# Altium PCB mla_opamp.PcbDoc (part 2 of 3)
Units mil, origin at the board's own origin, x right, y up, seen from the top; angles counter-clockwise.
Board outline 7165.35 x 3582.68 mil, 4 copper layers (Top Layer, PWD, GND, Bottom Layer), stack 23.756 mil thick; 177 components, 237 nets, 809 pads, 473 vias.
Unrouted connection lines stored in the file: 312.
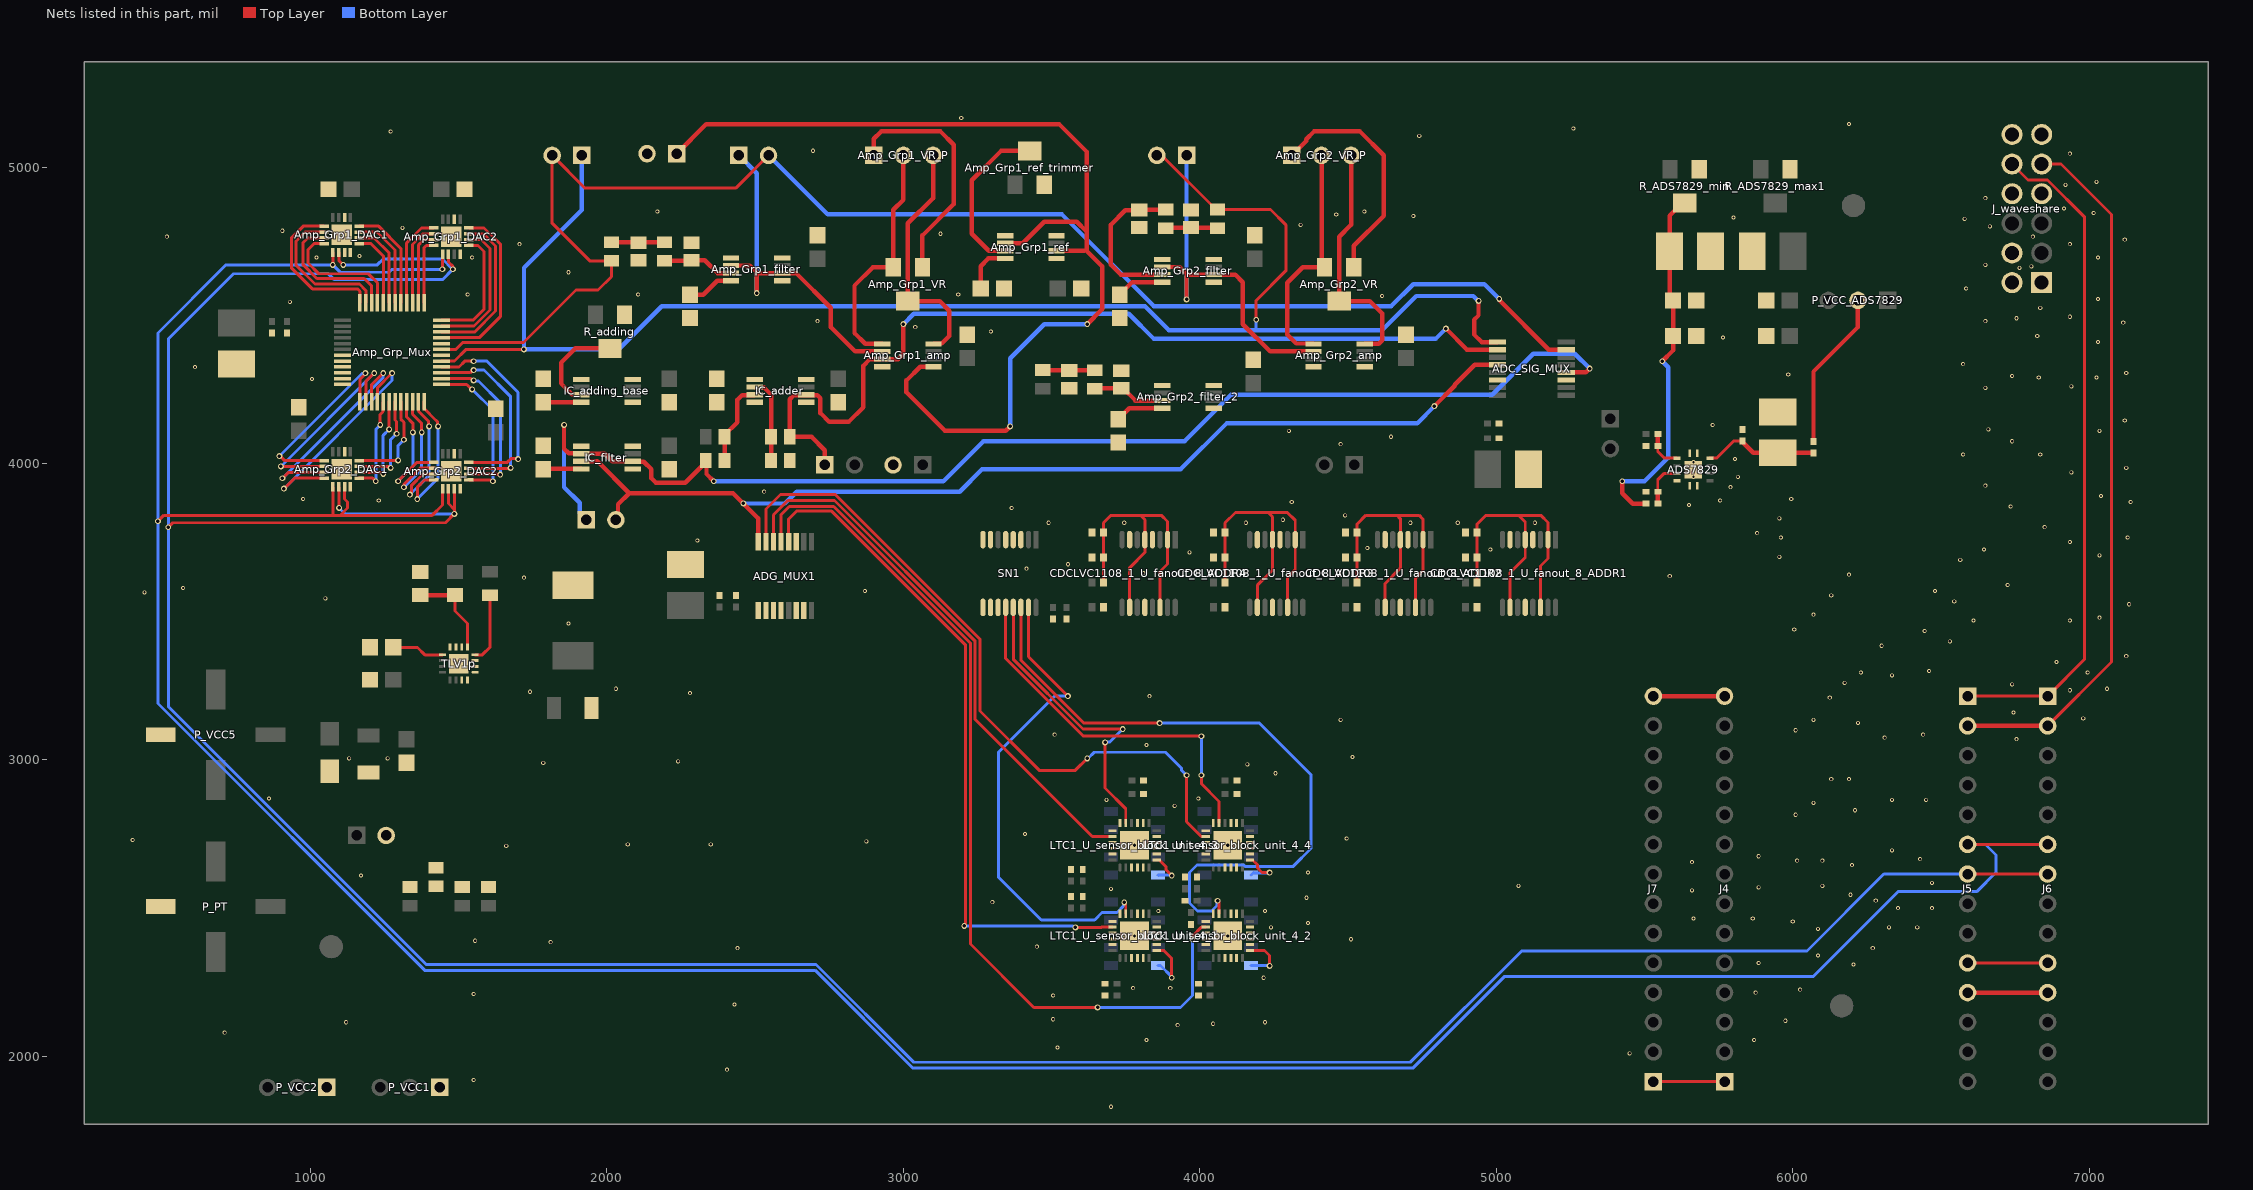
[diagram p4: the nets of this part, all layers, seen from the top]

## Via types
v1: diameter 13.78, hole 7.87, Top Layer to Bottom Layer, 282 vias
v2: diameter 19.68, hole 11.81, Top Layer to Bottom Layer, 187 vias
v3: diameter 20, hole 11, Top Layer to Bottom Layer, 4 vias

## Nets (pads, with @x,y where several pads share a name; then routed paths per layer and width w, separated by ;. In a path a pad name is that pad's centre, name@x,y a point inside that pad or via, vN(x,y) a via of type N, cw(c..) or ccw(c..) an arc to the next point about the centre after c; other vN are vias at no path point) (continued)
ADS7829_MIN: C_ADS7827_1.1 C_ADS7827_2.2 C_ADS7827_3.2 R3.1 R_ADS7829_min.W | length 1236
  Top Layer w15: v2(5425,3940) 5425,3900 5460.53,3864.47 R3.1@5505.31,3864.47 ; v2(5560,4345) 5596.31,4381.31 C_ADS7827_2.2@5596.31,4430 C_ADS7827_3.2@5596.31,4550 5584.47,4561.84 C_ADS7827_1.1@5584.47,4715.83 5584.47,4835.4 5627.8,4878.74 R_ADS7829_min.W@5635.68,4878.74
  Bottom Layer w15: v2(5425,3940) 5500,3940 5580,4020 5580,4325 v2(5560,4345)
amp_base_mux_grp1: ADC_SIG_MUX.7 Amp_Grp1_filter_R1.1 Amp_Grp1_P_base_o_of.2 Amp_Grp_Mux.43 Amp_Grp_Mux_P_base.2 | length 5057
  Top Layer w10: Amp_Grp_Mux.43@1441.85,4384.84 1489.84,4384.84 1513.21,4408.21 1718.21,4408.21 1895,4585 1970,4585 2015,4630 Amp_Grp1_filter_R1.1@2015,4683.5 1941.5,4683.5 1815,4810 Amp_Grp_Mux_P_base.2@1815,5039.37 1924.37,4930 2435.63,4930 Amp_Grp1_P_base_o_of.2@2545,5039.37
  Top Layer w15: v2(5010,4555) 5010,4551.39 5177.42,4383.98 ADC_SIG_MUX.7@5235.67,4383.98
  Bottom Layer w15: Amp_Grp1_P_base_o_of.2@2545,5039.37 2744.37,4840 3535,4840 3845,4530 4645,4530 4720,4605 4960,4605 v2(5010,4555)
amp_base_mux_grp2: ADC_SIG_MUX.9 Amp_Grp2_filter_R1.1 Amp_Grp2_P_base_o_of.2 Amp_Grp_Mux.41 Amp_Grp_Mux_P_base.1 | length 5537.4
  Top Layer w10: Amp_Grp_Mux.41@1441.85,4345.47 1485.47,4345.47 1525,4385 v2(1720,4385) ; Amp_Grp2_P_base_o_of.2@3855,5039.37 3864.39,5029.98 3880.61,5029.98 4054.09,4856.5 Amp_Grp2_filter_R1.1@4060,4856.5 4238.5,4856.5 4290,4805 4290,4650 4190,4550 v2(4190,4485)
  Top Layer w15: v2(4940,4548.34) 4940,4499.37 4925,4484.37 4925,4435 4950.43,4409.57 ADC_SIG_MUX.9@5004.33,4409.57
  Bottom Layer w10: 4185,4450 4190,4455 v2(4190,4485)
  Bottom Layer w15: Amp_Grp_Mux_P_base.1@1915,5039.37 1915,4855 1720,4660 v2(1720,4385) 2040,4385 2185,4530 3815,4530 3895,4450 4185,4450 4615,4450 4730,4565 4922.07,4565 4938.73,4548.34 v2(4940,4548.34)
amp_grp1_base1: Amp_Grp1_DAC1.1 Amp_Grp_Mux.12 | length 531.1
  Top Layer w10: Amp_Grp1_DAC1.1@1045.94,4800.37 975.37,4800.37 935,4760 935,4660 1006,4589 1158.37,4589 1166.73,4580.64 Amp_Grp_Mux.12@1166.73,4541.85
amp_grp1_base2: Amp_Grp1_DAC1.2 Amp_Grp_Mux.11 | length 501.2
  Top Layer w10: Amp_Grp1_DAC1.2@1045.94,4780.69 981.68,4780.69 951,4750 951,4669 1015,4605 1165,4605 1186.42,4583.58 Amp_Grp_Mux.11@1186.42,4541.85
amp_grp1_base3: Amp_Grp1_DAC1.3 Amp_Grp_Mux.10 | length 470.2
  Top Layer w10: Amp_Grp1_DAC1.3@1045.94,4761 991,4761 975,4745 975,4670 1021,4624 1181,4624 1206.1,4598.9 Amp_Grp_Mux.10@1206.1,4541.85
amp_grp1_base4: Amp_Grp1_DAC1.4 Amp_Grp_Mux.9 | length 437.8
  Top Layer w10: Amp_Grp1_DAC1.4@1045.94,4741.31 1011.31,4741.31 991,4721 991,4676.63 1027.63,4640 1195,4640 1225.79,4609.21 Amp_Grp_Mux.9@1225.79,4541.85
amp_grp1_base5: Amp_Grp1_DAC1.9 Amp_Grp_Mux.8 | length 256.4
  Top Layer w10: Amp_Grp1_DAC1.9@1164.06,4741.31 1203.69,4741.31 1245.47,4699.53 Amp_Grp_Mux.8@1245.47,4541.85
amp_grp1_base6: Amp_Grp1_DAC1.10 Amp_Grp_Mux.7 | length 290.3
  Top Layer w10: Amp_Grp1_DAC1.10@1164.06,4761 1214,4761 1265.16,4709.84 Amp_Grp_Mux.7@1265.16,4541.85
amp_grp1_base7: Amp_Grp1_DAC1.11 Amp_Grp_Mux.6 | length 324.2
  Top Layer w10: Amp_Grp1_DAC1.11@1164.06,4780.69 1224.32,4780.69 1284.84,4720.16 Amp_Grp_Mux.6@1284.84,4541.85
amp_grp1_base8: Amp_Grp1_DAC1.12 Amp_Grp_Mux.5 | length 355.1
  Top Layer w10: Amp_Grp1_DAC1.12@1164.06,4800.37 1229.63,4800.37 1304.53,4725.47 Amp_Grp_Mux.5@1304.53,4541.85
amp_grp1_base9: Amp_Grp1_DAC2.1 Amp_Grp_Mux.4 | length 314.9
  Top Layer w10: Amp_Grp_Mux.4@1324.21,4541.85 1324.21,4744.21 1374.53,4794.53 Amp_Grp1_DAC2.1@1415.94,4794.53
amp_grp1_base10: Amp_Grp1_DAC2.2 Amp_Grp_Mux.3 | length 284
  Top Layer w10: Amp_Grp_Mux.3@1343.9,4541.85 1343.9,4738.9 1379.84,4774.84 Amp_Grp1_DAC2.2@1415.94,4774.84
amp_grp1_base11: Amp_Grp1_DAC2.3 Amp_Grp_Mux.2 | length 254.4
  Top Layer w10: Amp_Grp_Mux.2@1363.58,4541.85 1363.58,4735.96 1382.78,4755.16 Amp_Grp1_DAC2.3@1415.94,4755.16
amp_grp1_base12: Amp_Grp1_DAC2.4 Amp_Grp_Mux.1 | length 222.1
  Top Layer w10: Amp_Grp_Mux.1@1383.27,4541.85 1383.27,4728.27 1390.47,4735.47 Amp_Grp1_DAC2.4@1415.94,4735.47
amp_grp1_base13: Amp_Grp1_DAC2.9 Amp_Grp_Mux.48 | length 412.5
  Top Layer w10: Amp_Grp_Mux.48@1441.85,4483.27 1548.01,4483.27 1584.87,4520.13 1584.87,4715.13 1565,4735 1534.53,4735 Amp_Grp1_DAC2.9@1534.06,4735.47
amp_grp1_base14: Amp_Grp1_DAC2.10 Amp_Grp_Mux.47 | length 476.3
  Top Layer w10: Amp_Grp_Mux.47@1441.85,4463.58 1550.96,4463.58 1605,4517.63 1605,4725 1574.84,4755.16 Amp_Grp1_DAC2.10@1534.06,4755.16
amp_grp1_base15: Amp_Grp1_DAC2.11 Amp_Grp_Mux.46 | length 537.7
  Top Layer w10: Amp_Grp_Mux.46@1441.85,4443.9 1553.9,4443.9 1624,4514 1624,4733.37 1582.53,4774.84 Amp_Grp1_DAC2.11@1534.06,4774.84
amp_grp1_base16: Amp_Grp1_DAC2.12 Amp_Grp_Mux.45 | length 601
  Top Layer w10: Amp_Grp_Mux.45@1441.85,4424.21 1569.21,4424.21 1640,4495 1640,4740 1585.47,4794.53 Amp_Grp1_DAC2.12@1534.06,4794.53
amp_grp1_ref: Amp_Grp1_amp.5 Amp_Grp1_ref.2 Amp_Grp1_ref.6 Amp_Grp1_ref_debug.1 | length 3597.7
  Top Layer w15: Amp_Grp1_ref_debug.1@2235,5045 2335,5145 3525,5145 3617.8,5052.2 3617.8,4782.2 ; Amp_Grp1_amp.5@3101.61,4326.61 3056.61,4326.61 3010,4280 3010,4240 3140,4110 3345,4110 v2(3360,4125) ; Amp_Grp1_ref.2@3343.39,4742.8 3402.8,4742.8 3475,4815 3585,4815 3617.8,4782.2 ; Amp_Grp1_ref.6@3516.61,4717.2 3610.59,4717.2 ; v2(3620,4470) 3670,4520 3670,4665 3617.8,4717.2 3617.8,4782.2
  Bottom Layer w15: v2(3360,4125) 3360,4355 3475,4470 v2(3620,4470)
Amp_Grp1_VR_CCW: Amp_Grp1_VR.1 Amp_Grp1_VR_P.1 | length 811.4
  Top Layer w15: Amp_Grp1_VR_P.1@2900,5039.37 2900,5095 2925,5120 3125,5120 3170,5075 3170,4875 3064.21,4769.21 Amp_Grp1_VR.1@3064.21,4662.09
Amp_Grp1_VR_CW: Amp_Grp1_amp.1 Amp_Grp1_VR.3 Amp_Grp1_VR_P.2 | length 816.5
  Top Layer w15: Amp_Grp1_amp.1@2928.39,4403.39 2871.61,4403.39 2835,4440 2835,4600 2897.09,4662.09 Amp_Grp1_VR.3@2965.79,4662.09 2965.79,4855.79 3000,4890 Amp_Grp1_VR_P.2@3000,5039.37
Amp_Grp1_VR_W: Amp_Grp1_amp.8 Amp_Grp1_VR.2 Amp_Grp1_VR_P.3 | length 829.7
  Top Layer w15: Amp_Grp1_VR_P.3@3100,5039.37 3100,4895 3015,4810 Amp_Grp1_VR.2@3015,4547.91 3122.09,4547.91 3155,4515 3155,4430 3129.74,4404.74 3102.97,4404.74 Amp_Grp1_amp.8@3101.61,4403.39
amp_grp2_base1: Amp_Grp2_DAC1.1 Amp_Grp_Mux.25 | length 667.8
  Top Layer w10: v2(895,4025) 897.62,4025 913.09,4009.53 Amp_Grp2_DAC1.1@1045.94,4009.53 ; Amp_Grp_Mux.25@1166.73,4208.15 1166.73,4284.11 1185,4302.38 v2(1185,4305)
  Bottom Layer w10: v2(895,4025) 1173.15,4303.15 1183.15,4303.15 v2(1185,4305)
amp_grp2_base2: Amp_Grp2_DAC1.2 Amp_Grp_Mux.26 | length 700.2
  Top Layer w10: v2(900,3990) 900.08,3989.92 1045.87,3989.92 Amp_Grp2_DAC1.2@1045.94,3989.84 ; Amp_Grp_Mux.26@1186.42,4208.15 1186.42,4276.42 v2(1215,4305)
  Bottom Layer w10: v2(900,3990) v2(1215,4305)
amp_grp2_base3: Amp_Grp2_DAC1.3 Amp_Grp_Mux.27 | length 758.1
  Top Layer w10: v2(905,3950) 925.16,3970.16 Amp_Grp2_DAC1.3@1045.94,3970.16 ; Amp_Grp_Mux.27@1206.1,4208.15 1206.1,4266.1 v2(1245,4305)
  Bottom Layer w10: v2(905,3950) 1244.93,4289.93 1244.93,4304.93 v2(1245,4305)
amp_grp2_base4: Amp_Grp2_DAC1.4 Amp_Grp_Mux.28 | length 809.1
  Top Layer w10: v2(910,3915) 945.47,3950.47 Amp_Grp2_DAC1.4@1045.94,3950.47 ; Amp_Grp_Mux.28@1225.79,4208.15 1225.79,4255.79 v2(1275,4305)
  Bottom Layer w10: v2(910,3915) 1275,4280 v2(1275,4305)
amp_grp2_base5: Amp_Grp2_DAC1.9 Amp_Grp_Mux.29 | length 339
  Top Layer w10: Amp_Grp2_DAC1.9@1164.06,3950.47 1209.53,3950.47 v2(1220,3940) ; v2(1235,4130) 1235,4165 1244.57,4174.57 1244.57,4207.24 Amp_Grp_Mux.29@1245.47,4208.15
  Bottom Layer w10: v2(1220,3940) 1220,4115 v2(1235,4130)
amp_grp2_base6: Amp_Grp2_DAC1.10 Amp_Grp_Mux.30 | length 334.6
  Top Layer w10: Amp_Grp2_DAC1.10@1164.06,3970.16 1239.84,3970.16 v2(1245,3965) ; v2(1265,4115) 1265.08,4115.08 1265.08,4208.07 Amp_Grp_Mux.30@1265.16,4208.15
  Bottom Layer w10: v2(1245,3965) 1245,4095 v2(1265,4115)
amp_grp2_base7: Amp_Grp2_DAC1.11 Amp_Grp_Mux.31 | length 341.5
  Top Layer w10: Amp_Grp2_DAC1.11@1164.06,3989.84 1265.16,3989.84 v2(1270,3985) ; Amp_Grp_Mux.31@1284.84,4208.15 1284.84,4146.4 1290,4141.24 v2(1290,4100)
  Bottom Layer w10: v2(1270,3985) 1270,4080 v2(1290,4100)
amp_grp2_base8: Amp_Grp2_DAC1.12 Amp_Grp_Mux.32 | length 341.9
  Top Layer w10: Amp_Grp2_DAC1.12@1164.06,4009.53 1294.53,4009.53 v2(1295,4010) ; Amp_Grp_Mux.32@1304.53,4208.15 1304.53,4149.34 1315,4138.87 v2(1315,4080)
  Bottom Layer w10: v2(1295,4010) 1295,4060 v2(1315,4080)
amp_grp2_base9: Amp_Grp2_DAC2.1 Amp_Grp_Mux.33 | length 444.8
  Top Layer w10: v2(1295,3940) 1358.69,4003.69 Amp_Grp2_DAC2.1@1415.94,4003.69 ; Amp_Grp_Mux.33@1324.21,4208.15 1324.21,4156.71 1345,4135.93 v2(1345,4105)
  Bottom Layer w10: v2(1295,3940) 1345,3990 v2(1345,4105)
amp_grp2_base10: Amp_Grp2_DAC2.2 Amp_Grp_Mux.34 | length 459.2
  Top Layer w10: v2(1315,3920) 1315,3930 1369,3984 Amp_Grp2_DAC2.2@1415.94,3984 ; Amp_Grp_Mux.34@1343.9,4208.15 1343.9,4166.1 1375,4135 v2(1375,4105)
  Bottom Layer w10: v2(1315,3920) 1375,3980 v2(1375,4105)
amp_grp2_base11: Amp_Grp2_DAC2.3 Amp_Grp_Mux.35 | length 479.5
  Top Layer w10: v2(1335,3895) 1340,3900 1340,3925 1379.32,3964.32 Amp_Grp2_DAC2.3@1415.94,3964.32 ; Amp_Grp_Mux.35@1363.58,4208.15 1364.49,4207.24 1364.49,4176.43 1398.15,4142.77 1398.15,4126.85 v2(1400,4125)
  Bottom Layer w10: v2(1335,3895) 1400,3960 v2(1400,4125)
amp_grp2_base12: Amp_Grp2_DAC2.4 Amp_Grp_Mux.36 | length 483.1
  Top Layer w10: v2(1360,3880) 1360,3920 1384.63,3944.63 Amp_Grp2_DAC2.4@1415.94,3944.63 ; Amp_Grp_Mux.36@1383.27,4208.15 1383.27,4185.02 1423.29,4145 1424.14,4145 1428.15,4141 1428.15,4126.85 v2(1430,4125)
  Bottom Layer w10: v2(1360,3880) 1430,3950 v2(1430,4125)
amp_grp2_base13: Amp_Grp2_DAC2.9 Amp_Grp_Mux.37 | length 531.9
  Top Layer w10: Amp_Grp_Mux.37@1441.85,4266.73 1526.6,4266.73 1543.33,4250 v2(1545,4250) ; Amp_Grp2_DAC2.9@1534.06,3944.63 1607.75,3944.63 1612.38,3940 v2(1615,3940)
  Bottom Layer w10: v2(1545,4250) 1615,4180 v2(1615,3940)
amp_grp2_base14: Amp_Grp2_DAC2.10 Amp_Grp_Mux.38 | length 581.3
  Top Layer w10: Amp_Grp_Mux.38@1441.85,4286.42 1540.96,4286.42 1547.38,4280 v2(1550,4280) ; Amp_Grp2_DAC2.10@1534.06,3964.32 1624.84,3964.32 1625.86,3963.3 1639.01,3963.3 v2(1640,3962.32)
  Bottom Layer w10: v2(1550,4280) 1551.85,4278.15 1566.85,4278.15 1640,4205 v2(1640,3962.32)
amp_grp2_base15: Amp_Grp2_DAC2.11 Amp_Grp_Mux.39 | length 656.2
  Top Layer w10: Amp_Grp_Mux.39@1441.85,4306.1 1538.48,4306.1 1547.38,4315 v2(1550,4315) ; Amp_Grp2_DAC2.11@1534.06,3984 1534.9,3983.16 1673.16,3983.16 v2(1675,3985)
  Bottom Layer w10: v2(1550,4315) 1585,4315 1675,4225 v2(1675,3985)
amp_grp2_base16: Amp_Grp2_DAC2.12 Amp_Grp_Mux.40 | length 706.8
  Top Layer w10: Amp_Grp_Mux.40@1441.85,4325.79 1500.79,4325.79 1520,4345 v2(1550,4345) ; Amp_Grp2_DAC2.12@1534.06,4003.69 1663.69,4003.69 1676.85,4016.85 1698.15,4016.85 v2(1700,4015)
  Bottom Layer w10: v2(1550,4345) 1595,4345 1700,4240 v2(1700,4015)
Amp_Grp2_VR_CCW: Amp_Grp2_VR.1 Amp_Grp2_VR_P.1 | length 799.5
  Top Layer w15: Amp_Grp2_VR_P.1@4310,5039.37 4358.51,5087.88 4358.51,5093.51 4385,5120 4540,5120 4620,5040 4620,4835 4519.21,4734.21 Amp_Grp2_VR.1@4519.21,4662.09
Amp_Grp2_VR_CW: Amp_Grp2_amp.1 Amp_Grp2_VR.3 Amp_Grp2_VR_P.2 | length 805.6
  Top Layer w15: Amp_Grp2_amp.1@4383.39,4403.39 4382.03,4404.74 4325.26,4404.74 4295,4435 4295,4610 4347.09,4662.09 Amp_Grp2_VR.3@4420.79,4662.09 4411,4671.87 4411,5038.37 Amp_Grp2_VR_P.2@4410,5039.37
Amp_Grp2_VR_W: Amp_Grp2_amp.8 Amp_Grp2_VR.2 Amp_Grp2_VR_P.3 | length 824.5
  Top Layer w15: Amp_Grp2_VR_P.3@4510,5039.37 4510,4805 4470,4765 Amp_Grp2_VR.2@4470,4547.91 4572.91,4547.91 4615,4505.83 4615,4415 4603.39,4403.39 Amp_Grp2_amp.8@4556.61,4403.39
ARDUINO_AREF: J4.1 J7.1 | length 240
  Top Layer w10: J7.1@5530,1915 J4.1@5770,1915
ARDUINO_RESET: J5.10 J6.10 | length 270
  Top Layer w10: J5.10@6590,2315 J6.10@6860,2315
arduino_reset_FPGA: J4.14 J7.14 | length 240
  Top Layer w15: J7.14@5530,3215 J4.14@5770,3215
C_VCC3.3_U_fanout_8_ADDR1: C5_U_fanout_8_ADDR1.2 C10_U_fanout_8_ADDR1.2 CDCLVC1108_1_U_fanout_8_ADDR1.2 CDCLVC1108_1_U_fanout_8_ADDR1.5 CDCLVC1108_1_U_fanout_8_ADDR1.10 CDCLVC1108_1_U_fanout_8_ADDR1.14 FB1_U_fanout_8_ADDR1.2 | length 1095.5
  Top Layer w10: FB1_U_fanout_8_ADDR1.2@4935,3598.89 C5_U_fanout_8_ADDR1.2@4935,3682.78 C10_U_fanout_8_ADDR1.2@4935,3766.67 4935,3795 4965,3825 5075,3825 ; CDCLVC1108_1_U_fanout_8_ADDR1.10@5046.46,3514.68 5046.46,3631.46 5097.64,3682.64 CDCLVC1108_1_U_fanout_8_ADDR1.5@5097.64,3743.03 5097.64,3802.36 5075,3825 ; CDCLVC1108_1_U_fanout_8_ADDR1.14@5148.82,3514.68 5148.82,3653.82 5174.41,3679.41 CDCLVC1108_1_U_fanout_8_ADDR1.2@5174.41,3743.03 5174.41,3800.59 5150,3825 5075,3825
C_VCC3.3_U_fanout_8_ADDR2: C5_U_fanout_8_ADDR2.2 C10_U_fanout_8_ADDR2.2 CDCLVC1108_1_U_fanout_8_ADDR2.2 CDCLVC1108_1_U_fanout_8_ADDR2.5 CDCLVC1108_1_U_fanout_8_ADDR2.10 CDCLVC1108_1_U_fanout_8_ADDR2.14 FB1_U_fanout_8_ADDR2.2 | length 1081.1
  Top Layer w10: FB1_U_fanout_8_ADDR2.2@4530,3598.89 C5_U_fanout_8_ADDR2.2@4530,3682.78 C10_U_fanout_8_ADDR2.2@4530,3766.67 4530,3795 4560,3825 4665,3825 ; CDCLVC1108_1_U_fanout_8_ADDR2.10@4625.14,3514.68 4625.14,3595.14 4676.32,3646.32 CDCLVC1108_1_U_fanout_8_ADDR2.5@4676.32,3743.03 4676.32,3813.68 4665,3825 ; CDCLVC1108_1_U_fanout_8_ADDR2.14@4727.5,3514.68 4727.5,3612.5 4753.09,3638.09 CDCLVC1108_1_U_fanout_8_ADDR2.2@4753.09,3743.03 4753.09,3811.91 4740,3825 4665,3825
C_VCC3.3_U_fanout_8_ADDR3: C5_U_fanout_8_ADDR3.2 C10_U_fanout_8_ADDR3.2 CDCLVC1108_1_U_fanout_8_ADDR3.2 CDCLVC1108_1_U_fanout_8_ADDR3.5 CDCLVC1108_1_U_fanout_8_ADDR3.10 CDCLVC1108_1_U_fanout_8_ADDR3.14 FB1_U_fanout_8_ADDR3.2 | length 1115.5
  Top Layer w10: FB1_U_fanout_8_ADDR3.2@4084.69,3598.89 C5_U_fanout_8_ADDR3.2@4084.69,3682.78 C10_U_fanout_8_ADDR3.2@4084.69,3766.67 4084.69,3799.69 4120,3835 4230,3835 ; CDCLVC1108_1_U_fanout_8_ADDR3.10@4193.82,3514.68 4193.82,3588.82 4245,3640 CDCLVC1108_1_U_fanout_8_ADDR3.5@4245,3743.03 4245,3820 4230,3835 ; CDCLVC1108_1_U_fanout_8_ADDR3.14@4296.18,3514.68 4296.18,3616.18 4321.77,3641.77 CDCLVC1108_1_U_fanout_8_ADDR3.2@4321.77,3743.03 4321.77,3808.23 4295,3835 4230,3835
C_VCC3.3_U_fanout_8_ADDR4: C5_U_fanout_8_ADDR4.2 C10_U_fanout_8_ADDR4.2 CDCLVC1108_1_U_fanout_8_ADDR4.2 CDCLVC1108_1_U_fanout_8_ADDR4.5 CDCLVC1108_1_U_fanout_8_ADDR4.10 CDCLVC1108_1_U_fanout_8_ADDR4.14 FB1_U_fanout_8_ADDR4.2 | length 1074.3
  Top Layer w10: FB1_U_fanout_8_ADDR4.2@3674.69,3598.89 C5_U_fanout_8_ADDR4.2@3674.69,3682.78 C10_U_fanout_8_ADDR4.2@3674.69,3766.67 3674.69,3799.69 3700,3825 3800,3825 ; CDCLVC1108_1_U_fanout_8_ADDR4.10@3763.23,3514.68 3763.23,3648.23 3814.41,3699.41 CDCLVC1108_1_U_fanout_8_ADDR4.5@3814.41,3743.03 3815,3743.62 3815,3810 3800,3825 ; CDCLVC1108_1_U_fanout_8_ADDR4.14@3865.59,3514.68 3865.59,3635.59 3891.18,3661.18 CDCLVC1108_1_U_fanout_8_ADDR4.2@3891.18,3743.03 3891.18,3803.82 3870,3825 3800,3825
DAC_SCL: Amp_Grp1_DAC1.6 Amp_Grp1_DAC2.6 Amp_Grp2_DAC1.6 Amp_Grp2_DAC2.6 Amp_Grp2_DAC2.7 J5.7 J6.7 | length 11527.4
  Top Layer w10: v2(520,3785) 535,3800 1455,3800 v2(1485,3830) 1484.92,3830.08 1484.92,3845.08 ; Amp_Grp2_DAC1.6@1095.16,3920.94 1095.16,3850.92 v2(1096.08,3850) ; Amp_Grp1_DAC1.6@1095.16,4711.79 1095.16,4684.84 v2(1110,4670) ; Amp_Grp2_DAC2.6@1465.16,3915.1 1465.16,3864.84 1484.92,3845.08 ; Amp_Grp1_DAC2.6@1465.16,4705.94 1465.16,4679.84 1480,4665 v2(1480,4655) ; Amp_Grp2_DAC2.7@1484.84,3915.1 1484.92,3915.02 1484.92,3845.08 ; J5.7@6590,2615 J6.7@6860,2615
  Bottom Layer w10: v2(1096.08,3850) 1116.08,3830 v2(1485,3830) ; v2(1110,4670) 1225,4670 1245,4690 1445,4690 v2(1480,4655) 1445,4620 1080,4620 1060,4640 740,4640 520,4420 v2(520,3785) 520,3180 1390,2310 2705,2310 3035,1980 4710,1980 5085.53,2355.53 6047.9,2355.53 6307.37,2615 J5.7@6590,2615
DAC_SDA: Amp_Grp1_DAC1.5 Amp_Grp1_DAC2.5 Amp_Grp2_DAC1.5 Amp_Grp2_DAC1.7 Amp_Grp2_DAC2.5 J5.6 J6.6 | length 11080.5
  Top Layer w10: v2(485,3805) 505,3825 1075.24,3825 ; v2(1075,4670) 1075,4680 1075.47,4680.47 Amp_Grp1_DAC1.5@1075.47,4711.79 ; Amp_Grp2_DAC1.5@1075.47,3920.94 1075.24,3920.71 1075.24,3825 ; Amp_Grp2_DAC1.7@1114.84,3920.94 1114.84,3880.16 1125,3870 1125,3849.45 1100.55,3825 ; v2(1445,4655) 1445.47,4655.47 Amp_Grp1_DAC2.5@1445.47,4705.94 ; Amp_Grp2_DAC2.5@1445.47,3915.1 1445.24,3914.87 1445.24,3860.05 1410.18,3825 1100.55,3825 ; J5.6@6590,2715 J6.6@6860,2715 ; 1075.24,3825 1100.55,3825
  Bottom Layer w10: v2(1445,4655) 1275,4655 1265,4645 1100,4645 v2(1075,4670) 715,4670 485,4440 v2(485,3805) 485,3190 1385,2290 2702.37,2290 3032.37,1960 4718.28,1960 5028.28,2270 6070,2270 6355.53,2555.53 6620.53,2555.53 6685.86,2620.86 6685.86,2679.14 6650,2715 J5.6@6590,2715
diff_amp_1_mux_filtered: Amp_Grp1_amp.2 Amp_Grp1_filter.2 Amp_Grp1_filter.6 Amp_Grp1_P_base_o_of.1 | length 1225.8
  Top Layer w15: Amp_Grp1_filter.2@2418.39,4667.8 2482.2,4667.8 2507.8,4642.2 ; v2(2505,4575) 2505.9,4575.9 2505.9,4640.31 2507.8,4642.2 ; Amp_Grp1_amp.2@2928.39,4377.8 2837.2,4377.8 2755,4460 2755,4525 2637.8,4642.2 Amp_Grp1_filter.6@2591.61,4642.2 2507.8,4642.2
  Bottom Layer w15: Amp_Grp1_P_base_o_of.1@2445,5039.37 2505,4979.37 v2(2505,4575)
diff_amp_2_mux_filtered: Amp_Grp2_amp.2 Amp_Grp2_filter.2 Amp_Grp2_filter.6 Amp_Grp2_P_base_o_of.1 | length 1281.8
  Top Layer w15: Amp_Grp2_filter.2@3873.39,4662.8 3932.2,4662.8 3957.8,4637.2 ; v2(3955,4553.34) 3955,4634.41 3957.8,4637.2 ; Amp_Grp2_amp.2@4383.39,4377.8 4237.2,4377.8 4145,4470 4145,4611.21 4119.01,4637.2 Amp_Grp2_filter.6@4046.61,4637.2 3957.8,4637.2
  Bottom Layer w15: v2(3955,4553.34) Amp_Grp2_P_base_o_of.1@3955,5039.37
GND: ADC_SIG_MUX.3 ADC_SIG_MUX.14 ADC_SIG_MUX_C1.2 ADC_SIG_MUX_C2.2 ADC_SIG_MUX_C3.2 Adding_r3.2 ADG_MUX1.3 ADG_MUX1.14 ADG_MUX1.15 ADS7829.4 ADS7829.9 Amp_Grp1_amp.4 Amp_Grp1_amp_C1.1 Amp_Grp1_amp_P_o_of.2 Amp_Grp1_DAC1.7 Amp_Grp1_DAC1.8 Amp_Grp1_DAC1.14 Amp_Grp1_DAC1.17 Amp_Grp1_DAC1_C1.2 Amp_Grp1_DAC2.8 Amp_Grp1_DAC2.14 Amp_Grp1_DAC2.17 Amp_Grp1_DAC2_C1.2 Amp_Grp1_filter.4 Amp_Grp1_filter_C1.1 Amp_Grp1_filter_C2.1 Amp_Grp1_filter_C2.2 Amp_Grp1_filter_C3.1 Amp_Grp1_filter_C4.1 Amp_Grp1_ref.4 Amp_Grp1_ref_C1.1 Amp_Grp1_ref_C2.1 Amp_Grp1_ref_C2.2 Amp_Grp1_ref_debug.2 Amp_Grp1_ref_trimmer.3 Amp_Grp2_amp.4 Amp_Grp2_amp.5 Amp_Grp2_amp_C1.1 Amp_Grp2_DAC1.8 Amp_Grp2_DAC1.14 Amp_Grp2_DAC1.17 Amp_Grp2_DAC1_C1.2 Amp_Grp2_DAC2.8 Amp_Grp2_DAC2.14 Amp_Grp2_DAC2.17 Amp_Grp2_DAC2_C2.2 Amp_Grp2_filter2_C1.1 Amp_Grp2_filter2_C2.1 Amp_Grp2_filter2_C2.2 Amp_Grp2_filter2_C3.1 Amp_Grp2_filter2_C4.1 Amp_Grp2_filter.4 Amp_Grp2_filter_2.4 Amp_Grp2_filter_C1.1 Amp_Grp2_filter_C2.1 Amp_Grp2_filter_C2.2 Amp_Grp2_filter_C3.1 Amp_Grp2_filter_C4.1 Amp_Grp_Mux.19 Amp_Grp_Mux.20 Amp_Grp_Mux.21 Amp_Grp_Mux.22 Amp_Grp_Mux.23 Amp_Grp_Mux.24 Amp_Grp_Mux_C1.2 Amp_Grp_Mux_C2.2 Amp_Grp_Mux_C3.2 C1p.2 C2p.1 C3p.1 C4_U_fanout_8_ADDR1.1 C4_U_fanout_8_ADDR2.1 C4_U_fanout_8_ADDR3.1 C4_U_fanout_8_ADDR4.1 C4p.1 C5_U_fanout_8_ADDR1.1 C5_U_fanout_8_ADDR2.1 C5_U_fanout_8_ADDR3.1 C5_U_fanout_8_ADDR4.1 C5p.2 C10_U_fanout_8_ADDR1.1 C10_U_fanout_8_ADDR2.1 C10_U_fanout_8_ADDR3.1 C10_U_fanout_8_ADDR4.1 C_ADG1.2 C_ADG2.2 C_ADG3.2 C_ADS7827_1.2 C_ADS7827_2.1 C_ADS7827_3.1 C_ADS7827_HMAX1.2 C_ADS7827_HMAX2.1 C_ADS7827_HMAX3.1 C_LTC1_1_U_sensor_block_unit_4_1.2 C_LTC1_1_U_sensor_block_unit_4_2.2 C_LTC1_1_U_sensor_block_unit_4_3.2 C_LTC1_1_U_sensor_block_unit_4_4.2 C_LTC2_1_U_sensor_block_unit_4_1.2 C_LTC2_1_U_sensor_block_unit_4_2.2 C_LTC2_1_U_sensor_block_unit_4_3.2 C_LTC2_1_U_sensor_block_unit_4_4.2 C_LTC3_1_U_sensor_block_unit_4_1.2 C_LTC3_1_U_sensor_block_unit_4_2.2 C_LTC3_1_U_sensor_block_unit_4_3.2 C_LTC3_1_U_sensor_block_unit_4_4.2 C_LTC4_1_U_sensor_block_unit_4_1.2 C_LTC4_1_U_sensor_block_unit_4_2.2 C_LTC4_1_U_sensor_block_unit_4_3.2 C_LTC4_1_U_sensor_block_unit_4_4.2 C_POW1.2 C_POW2.2 C_PWR_1.2 C_PWR_2.2 C_REF2.2 C_REF.2 C_SN2.2 C_SN_1.2 CDCLVC1108_1_U_fanout_8_ADDR1.4 CDCLVC1108_1_U_fanout_8_ADDR1.7 CDCLVC1108_1_U_fanout_8_ADDR1.12 CDCLVC1108_1_U_fanout_8_ADDR2.4 CDCLVC1108_1_U_fanout_8_ADDR2.7 CDCLVC1108_1_U_fanout_8_ADDR2.12 CDCLVC1108_1_U_fanout_8_ADDR3.4 CDCLVC1108_1_U_fanout_8_ADDR3.7 CDCLVC1108_1_U_fanout_8_ADDR3.12 CDCLVC1108_1_U_fanout_8_ADDR4.4 CDCLVC1108_1_U_fanout_8_ADDR4.7 CDCLVC1108_1_U_fanout_8_ADDR4.12 IC_adder.4 IC_adder_C1.1 IC_adder_C2.1 IC_adder_C2.2 IC_adding_base.4 IC_adding_base_C1.1 IC_adding_base_C2.1 IC_adding_base_C2.2 IC_filter.4 IC_filter_C1.1 IC_filter_C2.1 IC_filter_C2.2 J5.11 J6.11 J_waveshare.8 J_waveshare.12 LTC1_U_sensor_block_unit_4_1.5 LTC1_U_sensor_block_unit_4_1.11 LTC1_U_sensor_block_unit_4_1.14 LTC1_U_sensor_block_unit_4_1.21 LTC1_U_sensor_block_unit_4_1.22 LTC1_U_sensor_block_unit_4_1.25 LTC1_U_sensor_block_unit_4_2.5 LTC1_U_sensor_block_unit_4_2.11 LTC1_U_sensor_block_unit_4_2.14 LTC1_U_sensor_block_unit_4_2.21 LTC1_U_sensor_block_unit_4_2.22 LTC1_U_sensor_block_unit_4_2.25 LTC1_U_sensor_block_unit_4_3.5 LTC1_U_sensor_block_unit_4_3.11 LTC1_U_sensor_block_unit_4_3.14 LTC1_U_sensor_block_unit_4_3.21 LTC1_U_sensor_block_unit_4_3.22 LTC1_U_sensor_block_unit_4_3.25 LTC1_U_sensor_block_unit_4_4.5 LTC1_U_sensor_block_unit_4_4.11 LTC1_U_sensor_block_unit_4_4.14 LTC1_U_sensor_block_unit_4_4.21 LTC1_U_sensor_block_unit_4_4.22 LTC1_U_sensor_block_unit_4_4.25 P_C1p.1 P_PT.2 P_PT_DEBUG.2 P_VCC1.1 P_VCC2.1 P_VCC5.2 R3p.2 R_adding.CCW R_ADS7829_max1.CCW R_ADS7829_min.CCW SN1.3 SN1.4 SN1.5 SN1.8 TLV1p.6 TLV1p.7 TLV1p.8 TLV1p.15 TLV1p.16 TLV1p.17 | length 1193.7
  Top Layer w10: Amp_Grp1_filter_C2.1@2280,4569.37 Amp_Grp1_filter_C2.1@2295,4569.37
  Top Layer w15: IC_filter_C2.1@1785,3980.63 1785.98,3981.61 IC_filter.4@1913.39,3981.61 ; IC_adding_base_C2.1@1785,4206.61 IC_adding_base.4@1913.39,4206.61 ; Amp_Grp1_filter_C2.1@2295,4569.37 2324.37,4569.37 2371.61,4616.61 Amp_Grp1_filter.4@2418.39,4616.61 ; Amp_Grp1_ref_C2.2@3260.63,4590 3260.63,4665.63 3286.61,4691.61 Amp_Grp1_ref.4@3343.39,4691.61 Amp_Grp1_ref.4@3344.74,4690.26 ; Amp_Grp1_ref_C2.1@3339.37,4590 Amp_Grp1_ref_C2.1@3347.6,4598.23 ; Amp_Grp2_filter2_C2.2@3725,4149.37 3725,4150.35 3744.07,4169.43 3745.06,4169.43 3762.24,4186.61 Amp_Grp2_filter_2.4@3873.39,4186.61 ; Amp_Grp2_filter_C2.2@3730,4569.37 3730,4570.35 3771.26,4611.61 Amp_Grp2_filter.4@3873.39,4611.61 ; J5.11@6590,2215 J6.11@6860,2215
  other v1: 3700,1830 1550,1920 2405,1955 5450,2010 3520,2030 3820,2055 5870,2055 710,2080 3925,2105 4045,2110 1120,2115 4220,2115 5975,2120 3505,2125 2430,2175 3505,2205 1550,2210 5875,2215 6025,2225 3775,2230 3900,2230 4215,2265 6205,2310 5885,2315 6085,2340 2440,2365 6270,2365 3450,2370 1810,2385 1555,2390 4510,2395 6085,2430 4240,2435 6325,2435 6420,2435 4365,2450 6000,2455 5665,2465 5865,2465 3860,2490 4220,2490 6355,2500 6470,2500 3300,2520 6280,2525 4360,2535 6195,2545 5660,2560 3700,2565 5885,2570 5075,2575 6100,2575 6470,2585 1170,2610 4365,2620 6200,2645 5660,2655 6015,2660 6100,2660 6430,2665 5885,2675 6335,2695 1660,2710 2070,2715 2350,2715 2875,2725 400,2730 4495,2735 3410,2750 6010,2815 6210,2830 3915,2845 6070,2855 3685,2865 6335,2865 6450,2865 860,2870 3995,2870 6130,2935 6190,2935 4255,2955 4160,2985 1785,2990 2240,2995 1130,3005 1260,3005 4515,3010 3820,3050 6755,3070 6310,3075 3510,3085 6440,3085 6010,3100 6220,3125 4475,3135 6070,3135 6980,3140 6745,3160 6125,3210 3830,3215 2280,3225 1740,3230 6935,3235 2030,3240 7060,3240 6740,3255 6175,3260 6335,3285 6230,3295 6995,3295 6460,3300 6890,3330 7125,3350 6300,3385 6530,3400 6445,3435 6005,3440 1870,3460 6610,3470 6935,3470 7035,3480 6070,3490 7135,3525 6545,3535 1050,3545 6130,3555 440,3565 2870,3570 6480,3570 570,3580 6725,3590 1720,3615 5585,3620 6190,3625 3810,3630 3415,3645 3555,3660 6565,3675 5955,3685 7035,3690 3965,3700 4980,3710 6645,3710 4565,3715 6935,3735 2305,3740 5960,3750 7130,3750 5880,3765 6850,3785 3490,3800 3745,3800 4155,3800 4710,3800 4870,3800 5130,3800 4280,3810 5955,3815 4490,3825 3365,3850 6735,3855 5650,3860 4310,3870 7140,3870 1230,3875 5755,3875 975,3880 5995,3880 7040,3890 2530,3905 5790,3920 6650,3925 5665,3954.86 5815,3955 6940,3970 5645.31,3979.47 5684.69,3979.47 7125,3985 5665,4004.07 5805,4015 6575,4030 6835,4030 4475,4065 6740,4075 4645,4090 4300,4110 7035,4110 6660,4115 5730,4130 7120,4145 6650,4255 6940,4260 1005,4285 6830,4290 7025,4290 6740,4295 5985,4300 7125,4305 610,4325 6575,4335 7030,4410 5765,4425 6825,4430 3295,4445 3040,4460 7115,4475 2710,4480 6650,4480 6755,4490 6935,4495 6835,4525 930,4545 7030,4555 4615,4565 1530,4570 2105,4570 3185,4570 6585,4590 1870,4645 6765,4660 6805,4665 6650,4670 1020,4695 1545,4695 7030,4695 1165,4700 1705,4740 6935,4740 7120,4755 515,4765 6810,4765 3125,4775 905,4785 1310,4795 6665,4800 4340,4805 6580,4825 5800,4830 4720,4835 4460,4840 7015,4845 2170,4850 4555,4850 6915,4860 6650,4895 6920,4940 7025,4950 6935,5045 2695,5055 4740,5105 1270,5120 5260,5130 6190,5145 3195,5165.39
  other v3: 3779.53,2406.3 4094.49,2406.3 3779.53,2711.81 4094.49,2711.81
I2C_SCL: J5.2 J6.2 J_waveshare.9 | length 2389.5
  Top Layer w10: J_waveshare.9@6840,5010 6905,5010 7075,4840 7075,3330 J6.2@6860,3115
  Top Layer w15: J5.2@6590,3115 J6.2@6860,3115
I2C_SDA: J5.1 J6.1 J_waveshare.10 | length 2256.7
  Top Layer w10: J5.1@6590,3215 J6.1@6860,3215 6985,3340 6985,4830.67 6859.23,4956.43 6793.57,4956.43 J_waveshare.10@6740,5010
ltc_ena_1: LTC1_U_sensor_block_unit_4_1.17 SN1.15 | length 1644.8
  Top Layer w10: SN1.15@3421.77,3514.68 3421.77,3348.23 v2(3555,3215) ; v2@3744.16,2520 v2(3745,2519.16) 3750,2514.16 LTC1_U_sensor_block_unit_4_1.17@3750,2481.1
  Bottom Layer w10: v2(3555,3215) 3510,3215 3320,3025 3320,2605 3465,2460 3645,2460 3670.25,2485.25 3720.25,2485.25 3745,2510 v2(3745,2519.16)
ltc_ena_2: LTC1_U_sensor_block_unit_4_2.17 SN1.14 | length 2291.6
  Top Layer w10: SN1.14@3396.18,3514.68 3396.18,3336.19 3607.37,3125 3863,3125 v2(3864,3124) ; v2(4060,2525) 4064.96,2520.04 LTC1_U_sensor_block_unit_4_2.17@4064.96,2481.1
  Bottom Layer w10: v2(3864,3124) 4201,3124 4375,2950 4375,2700.84 4315,2640.84 4152.17,2640.84 4148.01,2645 3990,2645 3965,2620 3965,2516.94 3991.94,2490 4039.55,2490 4058.15,2508.59 4058.15,2523.15 v2(4060,2525)
ltc_ena_3: LTC1_U_sensor_block_unit_4_3.17 SN1.13 | length 1022.5
  Top Layer w10: SN1.13@3370.59,3514.68 3370.59,3339.15 3605.59,3104.16 v2(3740,3104.16) ; v2(3680,3059.16) 3680,2905.2 3750,2835.2 LTC1_U_sensor_block_unit_4_3.17@3750,2786.61
  Bottom Layer w10: v2(3680,3059.16) 3681.85,3061.01 3696.85,3061.01 v2(3740,3104.16)
ltc_ena_4: LTC1_U_sensor_block_unit_4_4.17 SN1.12 | length 1259.4
  Top Layer w10: SN1.12@3345,3514.68 3345,3342.12 3607.12,3080 v2(4005,3080) ; v2(4005,2948.16) 4005,2920 4064.96,2860.04 LTC1_U_sensor_block_unit_4_4.17@4064.96,2786.61
  Bottom Layer w10: v2(4005,2948.16) v2(4005,3080)
ltc_output_1: ADG_MUX1.4 LTC1_U_sensor_block_unit_4_1.20 | length 2323.7
  Top Layer w10: ADG_MUX1.4@2612.8,3735.67 2612.8,3812.8 2639,3839 2758.12,3839 3210,3387.12 3210,2445 v2(3205,2440) ; v2(3580,2435) 3667.34,2435 3668.16,2435.83 LTC1_U_sensor_block_unit_4_1.20@3704.72,2435.83
  Bottom Layer w10: v2(3205,2440) 3572.38,2440 3577.38,2435 v2(3580,2435)
ltc_output_2: ADG_MUX1.5 LTC1_U_sensor_block_unit_4_2.20 | length 3059.7
  Top Layer w10: ADG_MUX1.5@2587.2,3735.67 2587.2,3827.2 2615,3855 2764.74,3855 3226,3393.74 3226,2379 3440,2165 v2(3655,2165) ; v2(3975,2395) 3976.85,2396.85 3976.85,2407.57 4005.03,2435.75 4019.61,2435.75 LTC1_U_sensor_block_unit_4_2.20@4019.68,2435.83
  Bottom Layer w10: v2(3655,2165) 3935,2165 3975,2205 v2(3975,2395)
ltc_output_3: ADG_MUX1.6 LTC1_U_sensor_block_unit_4_3.20 | length 1878.1
  Top Layer w10: ADG_MUX1.6@2561.61,3735.67 2561.61,3826.61 2610,3875 2767.37,3875 3242,3400.37 3242,3136.69 3637.35,2741.34 LTC1_U_sensor_block_unit_4_3.20@3704.72,2741.34
ltc_output_4: ADG_MUX1.7 LTC1_U_sensor_block_unit_4_4.20 | length 2380.1
  Top Layer w10: ADG_MUX1.7@2536.02,3735.67 2536.02,3846.02 2585,3895 2770,3895 3258,3407 3258,3165 3458,2965 3580,2965 v2(3620,3005) ; v2(3955,2948.16) 3955,2791.45 4005.03,2741.42 4019.61,2741.42 LTC1_U_sensor_block_unit_4_4.20@4019.69,2741.34
  Bottom Layer w10: v2(3620,3005) 3622.62,3005 3643.46,3025.84 3884.16,3025.84 3937.32,2972.68 3937.32,2965.84 v2(3955,2948.16)
ltc_output_grp1: ADC_SIG_MUX.12 ADG_MUX1.8 filter_P_o_of.2 IC_filter.3 | length 3604.4
  Top Layer w15: IC_filter.3@1913.39,4007.2 1967.8,4007.2 2075,3900 ; filter_P_o_of.2@2030,3810 2037.03,3817.03 2037.03,3862.03 2075,3900 ; ADG_MUX1.8@2510.43,3735.67 2510.43,3814.57 v2(2460,3865) 2425,3900 2075,3900 ; v2(4791.51,4193.49) 4859.95,4261.94 4859.95,4265.25 4927.49,4332.8 ADC_SIG_MUX.12@5004.33,4332.8
  Bottom Layer w15: v2(2460,3865) 2600,3865 2640,3905 3190,3905 3265,3980 3935,3980 4090,4135 4733.01,4135 v2(4791.51,4193.49)
ltc_output_grp1_filtered: ADC_SIG_MUX.4 Adding_r2.1 filter_P_o_of.1 IC_filter.2 IC_filter.6 | length 4328.7
  Top Layer w15: v2(1855,4130) 1855,4050 1870.85,4034.15 1912.03,4034.15 IC_filter.2@1913.39,4032.8 1992.2,4032.8 2017.8,4007.2 IC_filter.6@2086.61,4007.2 2087.97,4005.85 2124.15,4005.85 2150,3980 2150,3950 2165,3935 2264.41,3935 2333.5,4004.09 Adding_r2.1@2333.5,4010 2335.57,4007.93 2335.57,3964.43 v2(2360,3940) ; ADC_SIG_MUX.4@5235.67,4307.2 5302.2,4307.2 v2(5315,4320)
  Bottom Layer w15: v2(1855,4130) 1855,3920 1907.97,3867.03 1907.97,3832.03 filter_P_o_of.1@1930,3810 ; v2(2360,3940) 3135,3940 3270,4075 3948.34,4075 4105,4231.66 4986.66,4231.66 5125,4370 5265,4370 v2(5315,4320)
ltc_output_grp1_filtered_added: ADC_SIG_MUX.10 adding_base.1 Adding_r4.2 Amp_Grp1_amp.3 IC_adder.6 | length 3146.4
  Top Layer w15: adding_base.1@2735,3995 2735,4045 2690,4090 Adding_r4.2@2616.5,4090 2616.5,4216.5 2630.85,4230.85 2670.26,4230.85 IC_adder.6@2671.61,4232.2 2672.97,4230.85 2709.15,4230.85 2720,4220 2720,4170 2750,4140 2815,4140 2865,4190 2865,4330 2885.85,4350.85 2927.03,4350.85 Amp_Grp1_amp.3@2928.39,4352.2 2982.2,4352.2 3000,4370 v2(3000,4470) ; v2(4830,4455) 4901.02,4383.98 ADC_SIG_MUX.10@5004.33,4383.98
  Bottom Layer w15: v2(3000,4470) 3035,4505 3760,4505 3845,4420 4795,4420 v2(4830,4455)
NetAdding_r1_2: Adding_r1.2 Adding_r2.2 IC_adder.3 | length 288.5
  Top Layer w15: Adding_r2.2@2396.5,4010 Adding_r1.2@2396.5,4090 2396.5,4095.91 2440,4139.41 2440,4215 2455.85,4230.85 2497.03,4230.85 IC_adder.3@2498.39,4232.2
NetAdding_r3_1: Adding_r3.1 Adding_r4.1 IC_adder.2 | length 288.2
  Top Layer w15: IC_adder.2@2498.39,4257.8 2499.74,4256.44 2529.66,4256.44 2553.5,4232.6 Adding_r4.1@2553.5,4090 Adding_r3.1@2553.5,4010
NetADG_MUX1_9: ADG_MUX1.9
NetADG_MUX1_10: ADG_MUX1.10
NetADG_MUX1_11: ADG_MUX1.11
NetADG_MUX1_12: ADG_MUX1.12
NetADS7829_1: ADS7829.1 C_REF.1 R1.2 | length 133.7
  Top Layer w10: C_REF.1@5544.69,4059.47 5544.69,4040.32 5567.15,4017.85 ADS7829.1@5609.88,4017.85
  Top Layer w15: C_REF.1@5544.69,4059.47 R1.2@5544.69,4099.47
NetADS7829_3: ADS7829.3 C_REF2.1 R3.2 | length 154.5
  Top Layer w10: C_REF2.1@5544.69,3904.47 5544.69,3944.68 5566.67,3966.67 ADS7829.3@5609.88,3966.67
  Top Layer w15: R3.2@5544.69,3864.47 C_REF2.1@5544.69,3904.47
NetADS7829_8: ADS7829.8 C_PWR_1.1 C_PWR_2.1 R2.1 | length 419.3
  Top Layer w10: ADS7829.8@5720.12,4017.85 5742.85,4017.85 5800.31,4075.32 5828.03,4075.32 C_PWR_1.1@5830,4073.35
  Top Layer w15: C_PWR_1.1@5830,4073.35 5867.24,4036.1 C_PWR_2.1@5950,4036.1 ; C_PWR_2.1@5929.21,4015.32 C_PWR_2.1@5950,4036.1 ; R2.1@6070,4036.1 C_PWR_2.1@5950,4036.1
NetAmp_Grp1_filter_1: Amp_Grp1_filter.1
NetAmp_Grp1_filter_3: Amp_Grp1_filter.3 Amp_Grp1_filter_C4.2 Amp_Grp1_filter_R2.2 | length 243.4
  Top Layer w15: Amp_Grp1_filter_R2.2@2193.69,4683.5 2194.67,4684.49 2284.02,4684.49 Amp_Grp1_filter_C4.2@2285,4685.47 2329.53,4685.47 2372.8,4642.2 Amp_Grp1_filter.3@2418.39,4642.2
NetAmp_Grp1_filter_5: Amp_Grp1_filter.5
NetAmp_Grp1_filter_8: Amp_Grp1_filter.8
NetAmp_Grp1_filter_C3_2: Amp_Grp1_filter_C3.2 Amp_Grp1_filter_R1.2 Amp_Grp1_filter_R2.1 | length 180.3
  Top Layer w15: Amp_Grp1_filter_R1.2@2015,4746.5 2015.98,4745.51 2105.33,4745.51 Amp_Grp1_filter_C3.2@2106.31,4744.53 2107.3,4745.51 2192.7,4745.51 Amp_Grp1_filter_R2.1@2193.69,4746.5
NetAmp_Grp1_ref_1: Amp_Grp1_ref.1
NetAmp_Grp1_ref_3: Amp_Grp1_ref.3 Amp_Grp1_ref_trimmer.2 | length 554.2
  Top Layer w15: Amp_Grp1_ref.3@3343.39,4717.2 3287.8,4717.2 3230,4775 3230,4955 3329.17,5054.17 Amp_Grp1_ref_trimmer.2@3425.79,5054.17
NetAmp_Grp1_ref_5: Amp_Grp1_ref.5
NetAmp_Grp1_ref_8: Amp_Grp1_ref.8
NetAmp_Grp2_filter2_C3_2: Amp_Grp2_filter2_C3.2 Amp_Grp2_filter2_R1.2 Amp_Grp2_filter2_R2.1 | length 177
  Top Layer w15: Amp_Grp2_filter2_R1.2@3470,4315 3470.98,4314.02 3558.66,4314.02 Amp_Grp2_filter2_C3.2@3559.65,4313.03 3560.63,4314.02 3644.37,4314.02 Amp_Grp2_filter2_R2.1@3645.35,4315
NetAmp_Grp2_filter2_C4_2: Amp_Grp2_filter2_C4.2 Amp_Grp2_filter2_R2.2 Amp_Grp2_filter_2.3 | length 246.1
  Top Layer w15: Amp_Grp2_filter2_R2.2@3645.35,4252.01 3646.34,4252.99 3734.02,4252.99 Amp_Grp2_filter2_C4.2@3735,4253.98 3740.91,4253.98 3782.68,4212.2 Amp_Grp2_filter_2.3@3873.39,4212.2
NetAmp_Grp2_filter_1: Amp_Grp2_filter.1
NetAmp_Grp2_filter_2_1: Amp_Grp2_filter_2.1
NetAmp_Grp2_filter_2_5: Amp_Grp2_filter_2.5
NetAmp_Grp2_filter_2_8: Amp_Grp2_filter_2.8
NetAmp_Grp2_filter_3: Amp_Grp2_filter.3 Amp_Grp2_filter_C4.2 Amp_Grp2_filter_R2.2 | length 527.9
  Top Layer w15: Amp_Grp2_filter.3@3873.39,4637.2 3732.8,4637.2 3700,4670 3700,4805 3748.73,4853.73 3794.2,4853.73 3795.98,4855.51 3883.66,4855.51 Amp_Grp2_filter_R2.2@3884.65,4856.5
NetAmp_Grp2_filter_5: Amp_Grp2_filter.5
NetAmp_Grp2_filter_8: Amp_Grp2_filter.8
NetAmp_Grp2_filter_C3_2: Amp_Grp2_filter_C3.2 Amp_Grp2_filter_R1.2 Amp_Grp2_filter_R2.1 | length 177
  Top Layer w15: Amp_Grp2_filter_R2.1@3884.65,4793.5 3885.63,4794.49 3969.37,4794.49 Amp_Grp2_filter_C3.2@3970.35,4795.47 3971.34,4794.49 4059.02,4794.49 Amp_Grp2_filter_R1.2@4060,4793.5
NetAmp_Grp_Mux_42: Amp_Grp_Mux.42
NetAmp_Grp_Mux_44: Amp_Grp_Mux.44
NetC5p_1: C5p.1 TLV1p.9 | length 180.2
  Top Layer w10: C5p.1@1275,3379.37 1360.63,3379.37 1385.47,3354.53 TLV1p.9@1444.88,3354.53
NetC_POW1_1: C_POW1.1 R_POW1.2 R_POW2.1 | length 5.7
  Top Layer w15: R_POW1.2@1335,2571.5 R_POW1.2@1336,2572.5 ; C_POW1.1@1422.33,2572.5 C_POW1.1@1423.33,2573.5 C_POW1.1@1424.34,2572.5 ; R_POW2.1@1510.66,2572.5 R_POW2.1@1511.67,2571.5
NetIC_adder_1: IC_adder.1
NetIC_adder_5: IC_adder.5
NetIC_adder_8: IC_adder.8
NetIC_adding_base_1: IC_adding_base.1
NetIC_adding_base_3: IC_adding_base.3 R_adding.W | length 338.9
  Top Layer w15: IC_adding_base.3@1913.39,4232.2 1912.03,4233.56 1881.44,4233.56 1845,4270 1845,4340 1892.91,4387.91 R_adding.W@2010,4387.91
NetIC_adding_base_5: IC_adding_base.5
NetIC_adding_base_8: IC_adding_base.8
NetIC_filter_1: IC_filter.1
NetIC_filter_5: IC_filter.5
NetIC_filter_8: IC_filter.8
NetJ_waveshare_1: J_waveshare.1
NetJ_waveshare_2: J_waveshare.2
NetJ_waveshare_4: J_waveshare.4
NetJ_waveshare_7: J_waveshare.7
NetJ_waveshare_11: J_waveshare.11
NetL1p_1: L1p.1 TLV1p.1 TLV1p.2 TLV1p.3
NetLTC1_U_sensor_block_unit_4_1_3: LTC1_U_sensor_block_unit_4_1.3
NetLTC1_U_sensor_block_unit_4_1_4: LTC1_U_sensor_block_unit_4_1.4
NetLTC1_U_sensor_block_unit_4_1_8: LTC1_U_sensor_block_unit_4_1.8
NetLTC1_U_sensor_block_unit_4_1_9: LTC1_U_sensor_block_unit_4_1.9
NetLTC1_U_sensor_block_unit_4_1_10: LTC1_U_sensor_block_unit_4_1.10
NetLTC1_U_sensor_block_unit_4_1_15: LTC1_U_sensor_block_unit_4_1.15
NetLTC1_U_sensor_block_unit_4_1_18: LTC1_U_sensor_block_unit_4_1.18
NetLTC1_U_sensor_block_unit_4_1_19: LTC1_U_sensor_block_unit_4_1.19
NetLTC1_U_sensor_block_unit_4_1_23: LTC1_U_sensor_block_unit_4_1.23
NetLTC1_U_sensor_block_unit_4_2_3: LTC1_U_sensor_block_unit_4_2.3
NetLTC1_U_sensor_block_unit_4_2_4: LTC1_U_sensor_block_unit_4_2.4
NetLTC1_U_sensor_block_unit_4_2_8: LTC1_U_sensor_block_unit_4_2.8
NetLTC1_U_sensor_block_unit_4_2_9: LTC1_U_sensor_block_unit_4_2.9
NetLTC1_U_sensor_block_unit_4_2_10: LTC1_U_sensor_block_unit_4_2.10
NetLTC1_U_sensor_block_unit_4_2_15: LTC1_U_sensor_block_unit_4_2.15
NetLTC1_U_sensor_block_unit_4_2_18: LTC1_U_sensor_block_unit_4_2.18
NetLTC1_U_sensor_block_unit_4_2_19: LTC1_U_sensor_block_unit_4_2.19
NetLTC1_U_sensor_block_unit_4_2_23: LTC1_U_sensor_block_unit_4_2.23
NetLTC1_U_sensor_block_unit_4_3_3: LTC1_U_sensor_block_unit_4_3.3
NetLTC1_U_sensor_block_unit_4_3_4: LTC1_U_sensor_block_unit_4_3.4
NetLTC1_U_sensor_block_unit_4_3_8: LTC1_U_sensor_block_unit_4_3.8
NetLTC1_U_sensor_block_unit_4_3_9: LTC1_U_sensor_block_unit_4_3.9
NetLTC1_U_sensor_block_unit_4_3_10: LTC1_U_sensor_block_unit_4_3.10
NetLTC1_U_sensor_block_unit_4_3_15: LTC1_U_sensor_block_unit_4_3.15
NetLTC1_U_sensor_block_unit_4_3_18: LTC1_U_sensor_block_unit_4_3.18
NetLTC1_U_sensor_block_unit_4_3_19: LTC1_U_sensor_block_unit_4_3.19
NetLTC1_U_sensor_block_unit_4_3_23: LTC1_U_sensor_block_unit_4_3.23
NetLTC1_U_sensor_block_unit_4_4_3: LTC1_U_sensor_block_unit_4_4.3
NetLTC1_U_sensor_block_unit_4_4_4: LTC1_U_sensor_block_unit_4_4.4
NetLTC1_U_sensor_block_unit_4_4_8: LTC1_U_sensor_block_unit_4_4.8
NetLTC1_U_sensor_block_unit_4_4_9: LTC1_U_sensor_block_unit_4_4.9
NetLTC1_U_sensor_block_unit_4_4_10: LTC1_U_sensor_block_unit_4_4.10
NetLTC1_U_sensor_block_unit_4_4_15: LTC1_U_sensor_block_unit_4_4.15
NetLTC1_U_sensor_block_unit_4_4_18: LTC1_U_sensor_block_unit_4_4.18
NetLTC1_U_sensor_block_unit_4_4_19: LTC1_U_sensor_block_unit_4_4.19
NetLTC1_U_sensor_block_unit_4_4_23: LTC1_U_sensor_block_unit_4_4.23
NetP_VCC_ADS7829_2: P_VCC_ADS7829.2 R2.2 | length 537.4
  Top Layer w15: R2.2@6070,4074.69 6070,4310 6220,4460 P_VCC_ADS7829.2@6220,4550
NetR1p_2: R1p.2 TLV1p.4 | length 236.1
  Top Layer w10: TLV1p.4@1555.12,3354.53 1579.53,3354.53 1605,3380 R1p.2@1605,3555.63
NetR2p_2: R2p.2 R3p.1 TLV1p.5 | length 310.4
  Top Layer w10: R2p.2@1487.5,3555.63 1487.5,3502.5 1529.53,3460.47 TLV1p.5@1529.53,3380.12
  Top Layer w15: R3p.1@1370,3555.63 R2p.2@1487.5,3555.63
NetSN1_7: SN1.7
NetSN1_9: SN1.9
NetSN1_10: SN1.10
NetSN1_11: SN1.11
pt_1_U_sensor_block_unit_4_1: LTC1_U_sensor_block_unit_4_1.7 photo_transistor_1_U_sensor_block_unit_4_1.1 | length 192.8
  Top Layer w10: LTC1_U_sensor_block_unit_4_1.7@3854.33,2357.09 3877.91,2357.09 3905,2330 v2(3905,2265)
  Bottom Layer w10: photo_transistor_1_U_sensor_block_unit_4_1.1@3858.27,2306.54 3866.83,2306.54 3905,2268.37 v2(3905,2265)
pt_1_U_sensor_block_unit_4_2: LTC1_U_sensor_block_unit_4_2.7 photo_transistor_1_U_sensor_block_unit_4_2.1 | length 170.2
  Top Layer w10: LTC1_U_sensor_block_unit_4_2.7@4169.29,2357.09 4217.91,2357.09 4235,2340 v2(4235,2305)
  Bottom Layer w10: photo_transistor_1_U_sensor_block_unit_4_2.1@4173.23,2306.54 4233.46,2306.54 v2(4235,2305)
pt_1_U_sensor_block_unit_4_3: LTC1_U_sensor_block_unit_4_3.7 photo_transistor_1_U_sensor_block_unit_4_3.1 | length 127.1
  Top Layer w10: LTC1_U_sensor_block_unit_4_3.7@3854.33,2662.6 3863.03,2662.6 3885,2640.63 3885,2630 v2(3905,2610)
  Bottom Layer w10: photo_transistor_1_U_sensor_block_unit_4_3.1@3858.27,2612.05 3860.32,2610 3861.34,2611.02 3903.98,2611.02 v2(3905,2610)
pt_1_U_sensor_block_unit_4_4: LTC1_U_sensor_block_unit_4_4.7 photo_transistor_1_U_sensor_block_unit_4_4.1 | length 156.2
  Top Layer w10: LTC1_U_sensor_block_unit_4_4.7@4169.29,2662.6 4177.99,2662.6 4194.04,2646.56 4194.04,2635.96 4210,2620 v2(4235,2620)
  Bottom Layer w10: photo_transistor_1_U_sensor_block_unit_4_4.1@4173.23,2612.05 4181.18,2620 4183.03,2618.15 4233.15,2618.15 v2(4235,2620)